# Altium PCB PCB3.PcbDoc (part 1 of 2)
Units mil, origin at the board's own origin, x right, y up, seen from the top; angles counter-clockwise.
Board outline 1930 x 3590 mil, 4 copper layers (Top Layer, Gnd, Voltage, Bottom Layer), stack 26.512 mil thick; 77 components, 87 nets, 563 pads, 158 vias.
Unrouted connection lines stored in the file: 33.
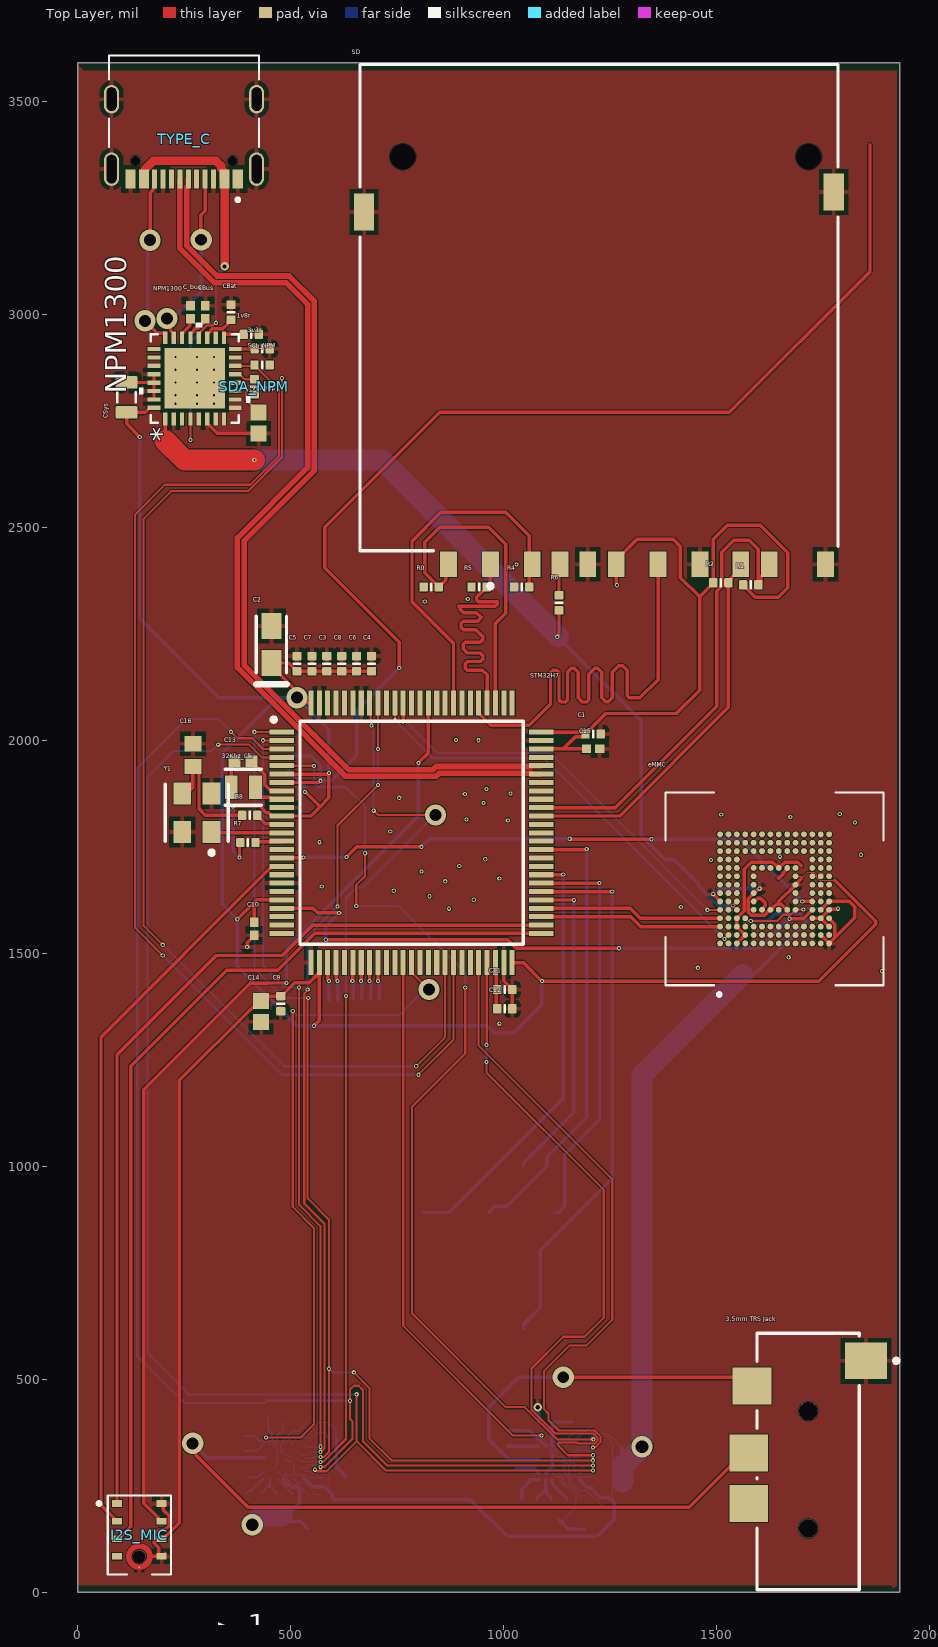
[diagram p0: Top Layer view]
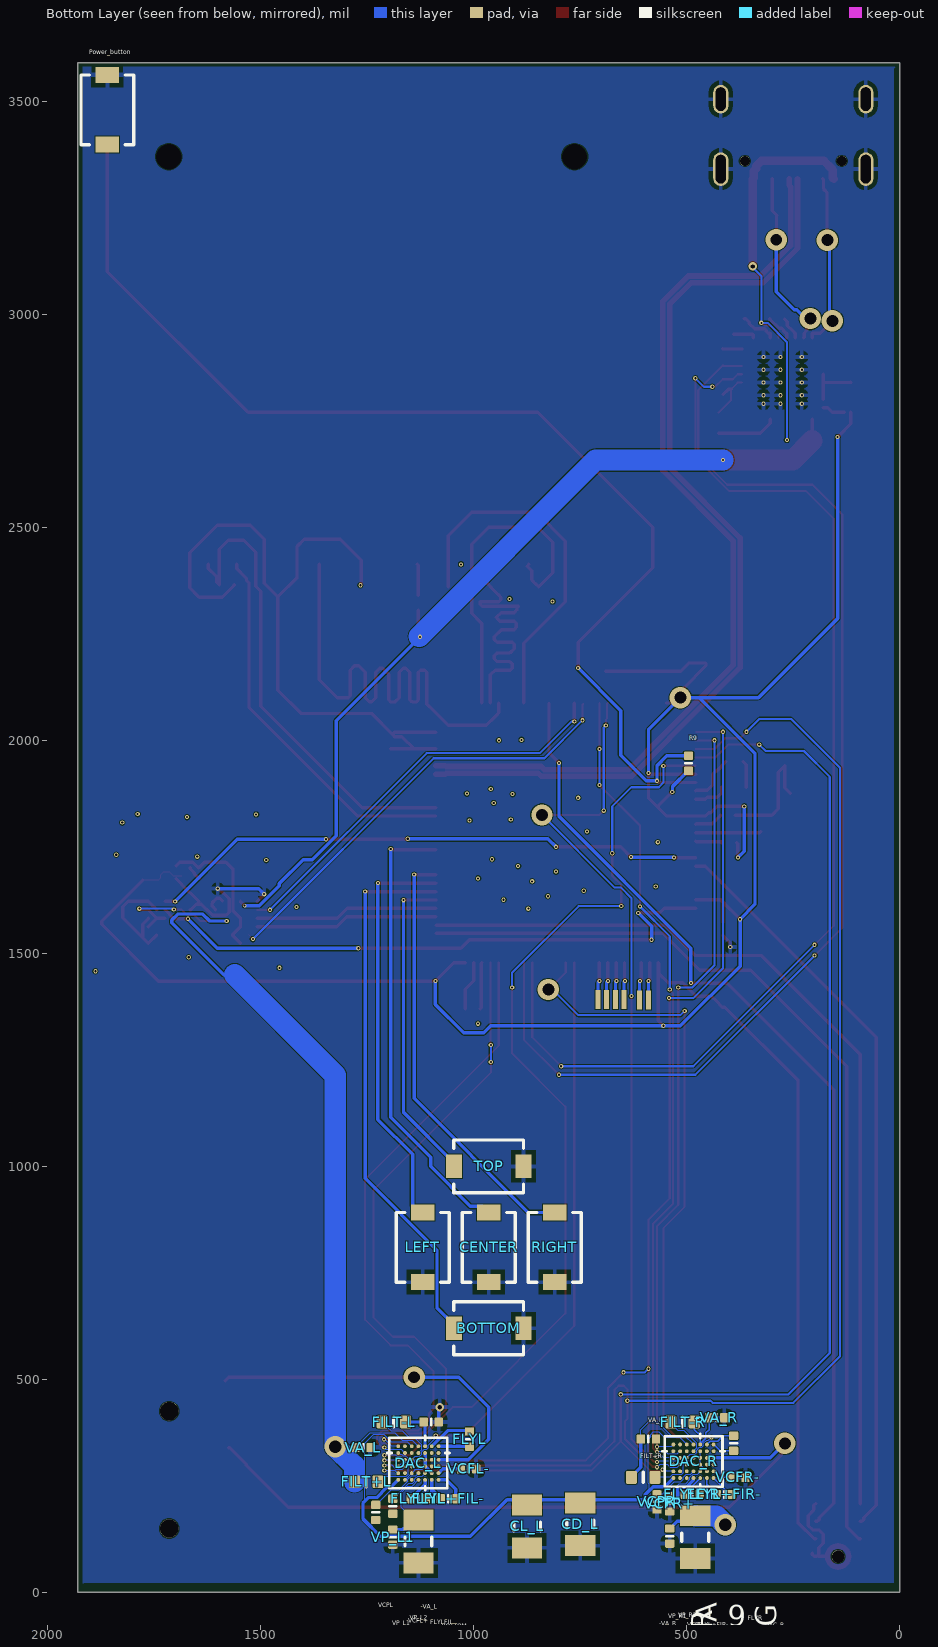
[diagram p1: Bottom Layer view, seen from below]
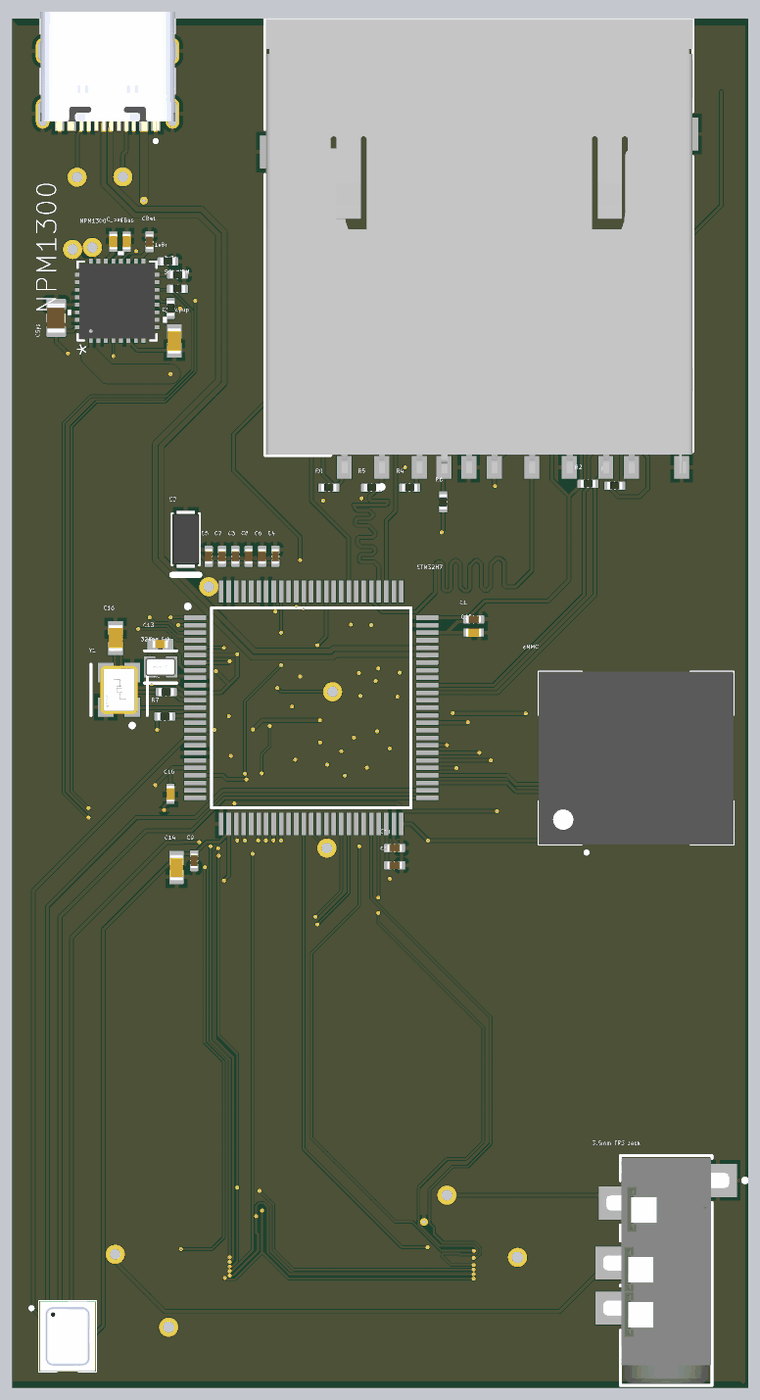
[diagram p3: 3D render of the assembled board from above, using the file's embedded part models]
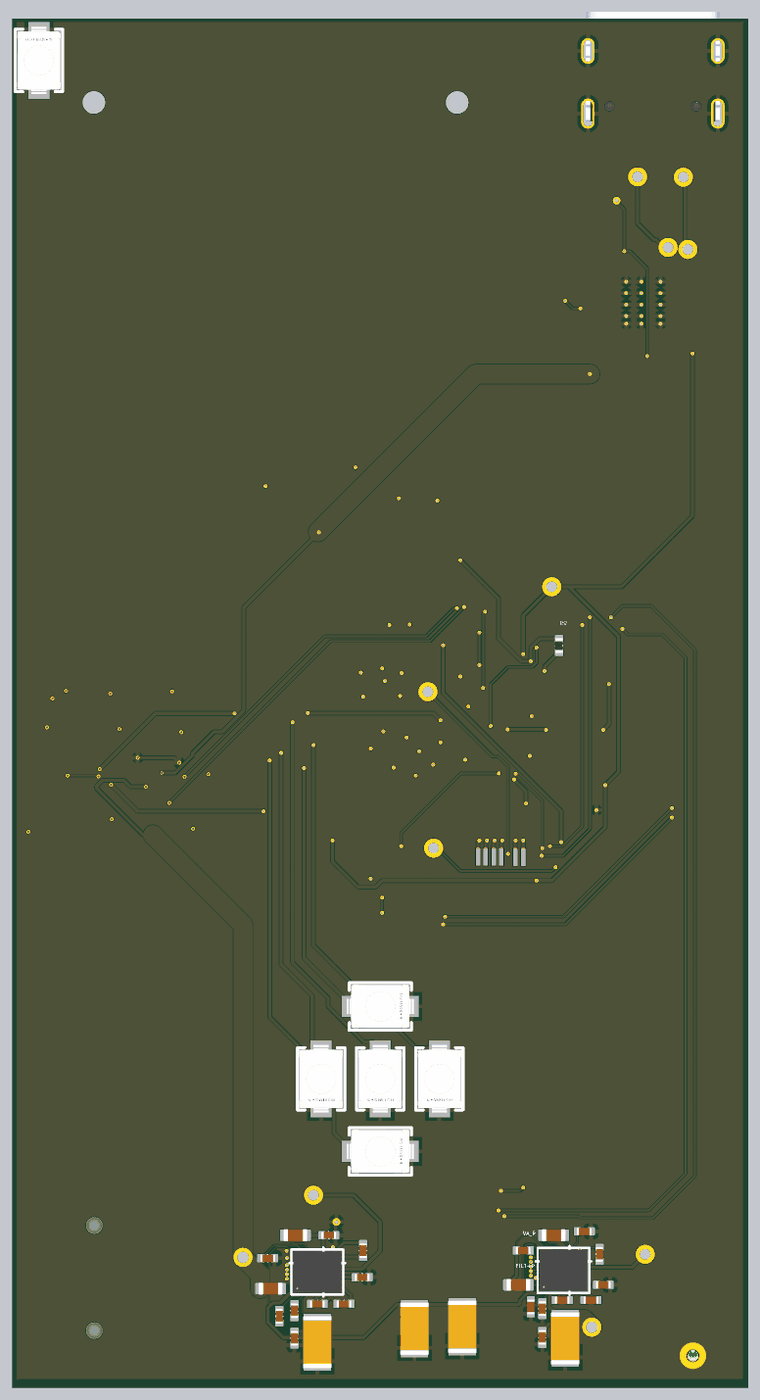
[diagram p4: 3D render of the assembled board from below, using the file's embedded part models]

## Layer stack, top to bottom
Top Solder: solder mask 0.4, Solder Resist, Dk 3.5
Top Layer: signal copper 1.4
Dielectric 2: prepreg 2.8, PP-006, Dk 4.1
Gnd: signal copper 2.7559
Dielectric 1: dielectric 12.6, FR-4, Dk 4.8
Voltage: signal copper 2.7559
Dielectric 3: prepreg 2.8, PP-006, Dk 4.1
Bottom Layer: signal copper 1.4
Bottom Solder: solder mask 0.4, Solder Resist, Dk 3.5

## Board outline
0,0 1930,0 1930,3590 0,3590

## Design rules (kind name [scope] priority, off if disabled: settings)
Clearance Clearance_BGA [InComponent('DAC_L','DAC_R','eMMC')] p1: gap=2 ignorepadtopadclearanceinfootprint=TRUE
Clearance [All] p2: gap=2 ignorepadtopadclearanceinfootprint=FALSE
DiffPairsRouting DiffPair_USB90CDiffPairsRouting [InDifferentialPairClass('USB90C')] p1: maxlimit=3 minlimit=3 mostfreqgap=3 toplayer_minwidth=13 toplayer_maxwidth=13 toplayer_prefwidth=13 midlayer1_minwidth=13 midlayer1_maxwidth=13 midlayer1_prefwidth=13 midlayer2_minwidth=13 midlayer2_maxwidth=13 midlayer2_prefwidth=13 bottomlayer_minwidth=13 bottomlayer_maxwidth=13 bottomlayer_prefwidth=13 maxuncoupledlength=500
DiffPairsRouting DiffPair_USB90CDiffPairsRouting_1 [InDifferentialPairClass('USB90C')] p2: maxlimit=3 minlimit=3 mostfreqgap=3 toplayer_minwidth=13 toplayer_maxwidth=13 toplayer_prefwidth=13 midlayer1_minwidth=13 midlayer1_maxwidth=13 midlayer1_prefwidth=13 midlayer2_minwidth=13 midlayer2_maxwidth=13 midlayer2_prefwidth=13 bottomlayer_minwidth=13 bottomlayer_maxwidth=13 bottomlayer_prefwidth=13 maxuncoupledlength=500
DiffPairsRouting [All] p3: maxlimit=10 minlimit=10 mostfreqgap=10 toplayer_minwidth=15 toplayer_maxwidth=15 toplayer_prefwidth=15 midlayer1_minwidth=15 midlayer1_maxwidth=15 midlayer1_prefwidth=15 midlayer2_minwidth=15 midlayer2_maxwidth=15 midlayer2_prefwidth=15 bottomlayer_minwidth=15 bottomlayer_maxwidth=15 bottomlayer_prefwidth=15 maxuncoupledlength=500
MatchedLengths DiffPair_USB90CMatchedLengths [InDifferentialPairClass('USB90C')] p1: tolerance=1000 checknetsindiffpair=FALSE checkdiffpairvsdiffpair=TRUE checkxsignals=TRUE checkothers=TRUE
MatchedLengths DiffPair_USB90CMatchedLengths_1 [InDifferentialPairClass('USB90C')] p2: tolerance=1000 checknetsindiffpair=FALSE checkdiffpairvsdiffpair=TRUE checkxsignals=TRUE checkothers=TRUE
PolygonConnect [All] p1: connectstyle=Relief reliefconductorwidth=10 reliefentries=4 polygonreliefangle="90 Angle" airgapwidth=10
RoutingVias [All] p1: holewidth=10 width=20 viastyle="Through Hole" minholewidth=2 minwidth=3 maxholewidth=40 maxwidth=50
SilkToSilkClearance [All] p1: silktosilkclearance=0.3
SolderMaskExpansion [All] p1: expansion=0 istentingtop=FALSE
SupplyNets "Schematic Supply Nets_7" [InNet('VCAP')] p1: voltage=0.000
SupplyNets "Schematic Supply Nets_6" [InNet('VAL')] p2: voltage=0.000
SupplyNets "Schematic Supply Nets_3" [InNet('VDDIO')] p3: voltage=0.000
SupplyNets "Schematic Supply Nets_2" [InNet('VBUSIN')] p4: voltage=0.000
SupplyNets "Schematic Supply Nets_1" [InNet('VBAT')] p5: voltage=0.000
SupplyNets "Schematic Supply Nets" [InNet('GND')] p6: voltage=0.000
UnRoutedNet [All] p1: checkbadconnections=TRUE
Width [All] p1: maxlimit=50 minlimit=1 preferedwidth=8
27 further rules are at their usual default settings.

## Classes and differential pairs
differential pair class USB90C: USB_D
component class Designator: C1 eMMC R0 R1 R2 R4 R5 R6 SD
differential pair USB_D: +USB_D_P -USB_D_N

## Components (designator, comment, footprint, x,y, rotation, side; value= is the part's Value field where it differs from the comment)
1v8r "Resistor 47K5 +/-1 % 0402 63 mW" RESC0402(1005)_L 408,2953 r180 top value=47.5k
"3.5mm TRS Jack" "SJ2-3574A-SMT-TR" FP-SJ2-3574A-SMT-TR-MFG 1715,307.48 r90 top
3v3r "301KR2F" RESC0402(1005)_L 433.28,2919 r180 top value=301k
32Khz_Clk "ABS06-32.768KHZ-9-T" FP-ABS06-MFG 389,1890 r180 top
-VA_L "Capacitor 2,2µF +/-20% 10V 0402" CAPC0402(1005)60_L 1100,400 r0 bottom value=2.2µF
-VA_R "Capacitor 2,2µF +/-20% 10V 0402" CAPC0402(1005)60_L 430,410 r0 bottom value=2.2µF
BOTTOM "TL1015AF160QG" FP-TL1015AF160QG-MFG 965,620 r180 bottom
C1 "Capacitor 100nF +/-20% 50V 0402" CAPC0402(1005)60_L 1210,2015 r0 top value=100nF
C2 "TAJA475K016RNJ" AVX-TAJ-A-2_L 455,2225 r90 top value=4.7µF
C3 "Capacitor 100nF +/-20% 50V 0402" CAPC0402(1005)60_L 585,2180 r270 top value=100nF
C4 "Capacitor 100nF +/-20% 50V 0402" CAPC0402(1005)60_L 690,2180 r270 top value=100nF
C5 "Capacitor 100nF +/-20% 50V 0402" CAPC0402(1005)60_L 515,2180 r270 top value=100nF
C6 "Capacitor 100nF +/-20% 50V 0402" CAPC0402(1005)60_L 655,2180 r270 top value=100nF
C7 "Capacitor 100nF +/-20% 50V 0402" CAPC0402(1005)60_L 550,2180 r270 top value=100nF
C8 "Capacitor 100nF +/-20% 50V 0402" CAPC0402(1005)60_L 620,2180 r270 top value=100nF
C9 "Capacitor 100nF +/-20% 50V 0402" CAPC0402(1005)60_L 477,1382 r90 top value=100nF
C10 "Capacitor 1 uF +/- 10% 6.3 V 0402" CAPC1005X55X25LL05T10 415,1558 r90 top value=1µF
C11 "Capacitor 2,2µF +/-20% 10V 0402" CAPC0402(1005)60_L 1002.72,1415 r180 top value=2.2µF
C12 "Capacitor 2,2µF +/-20% 10V 0402" CAPC0402(1005)60_L 1002.72,1370 r180 top value=2.2µF
C13 "Capacitor 10 pF +/- 5% 50 V 0402" CAPC1005X55X25ML05T05 388,1950 r0 top value=10pF
C14 "Capacitor 100 nF +/-10% 50 V 0603" CAPC1608X90X40NL10T20 431,1364 r90 top value=100nF
C15 "Capacitor 1 uF +/- 10% 6.3 V 0402" CAPC1005X55X25LL05T10 1210,1980 r180 top value=1µF
C16 "Capacitor 10 pF +/- 0.25 pF 50 V 0603" CAPC1608X87X35NL15T15 271,1965.43 r270 top value=10pF
C_bus "Capacitor 1 uF +/- 10% 6.3 V 0402" CAPC1005X55X25LL05T10 265,3005 r90 top value=1µF
C_vddpup "Capacitor 100 nF +/-10% 50 V 0603" CAPC1608X90X40NL10T20 425,2745 r90 top value=100nF
CBat "Capacitor 2,2µF +/-20% 10V 0402" CAPC0402(1005)60_L 360,3005 r90 top value=2.2µF
CBus "Capacitor 1 uF +/- 10% 6.3 V 0402" CAPC1005X55X25LL05T10 300,3005 r270 top value=1µF
CD_L "Capacitor 100 uF +/- 20% 6.3 V 1206" CAPC3216X190X55LL30T25 750,160 r90 bottom value=100µF
CENTER "TL1015AF160QG" FP-TL1015AF160QG-MFG 965,810 r270 bottom
CL_L "Capacitor 100 uF +/- 20% 6.3 V 1206" CAPC3216X190X55LL30T25 875,155 r90 bottom value=100µF
CSys "Capacitor 10µF +/-20% 25V 0805" CAPC0805(2012)145_L 115,2805 r270 top value=10µF
DAC_L "CS43131-CWZR" WLCSP42_CS43131-CWZR_CIR 1130,303.62 r90 bottom
DAC_R "CS43131-CWZR" WLCSP42_CS43131-CWZR_CIR 484.25,307.87 r90 bottom
eMMC "EMMC16G-TB29-90F01" BGA153N50P14X14_1300X1150X100N 1636.1,1651.42 r90 top
FILT+L "Capacitor 10µF +/-20% 10V 0603" CAPC0603(1608)100_L 1252.44,260 r0 bottom value=10µF
FILT+R "Capacitor 10µF +/-20% 10V 0603" CAPC0603(1608)100_L 602.44,270 r0 bottom value=10µF
FILT-L "Capacitor 10µF +/-20% 10V 0603" CAPC0603(1608)100_L 1187.56,400 r0 bottom value=10µF
FILT-R "Capacitor 10µF +/-20% 10V 0603" CAPC0603(1608)100_L 510,400 r0 bottom value=10µF
FLYL "Capacitor 2,2µF +/-20% 10V 0402" CAPC0402(1005)60_L 1010,360 r270 bottom value=2.2µF
FLYL+FIL- "Capacitor 2,2µF +/-20% 10V 0402" CAPC0402(1005)60_L 1060,220 r0 bottom value=2.2µF
FLYL+FIR- "Capacitor 2,2µF +/-20% 10V 0402" CAPC0402(1005)60_L 412.28,230 r0 bottom value=2.2µF
FLYLFIL "Capacitor 2,2µF +/-20% 10V 0402" CAPC0402(1005)60_L 1130,220 r0 bottom value=2.2µF
FLYLFIR "Capacitor 2,2µF +/-20% 10V 0402" CAPC0402(1005)60_L 487.72,230 r0 bottom value=2.2µF
FLYR "Capacitor 2,2µF +/-20% 10V 0402" CAPC0402(1005)60_L 390,350 r270 bottom value=2.2µF
I2S_MIC "INMP441ACEZ-R7" MIC_INMP441ACEZ-R7 145,135 r90 top
LEFT "TL1015AF160QG" FP-TL1015AF160QG-MFG 1120,810 r270 bottom
NPM1300 "NPM1300-QEAA-R7" QFN32_5X5_NOR 274.84,2849.5 r90 top
Power_button "TL1015AF160QG" FP-TL1015AF160QG-MFG 1860,3480 r90 bottom
R0 "10KR2F" RESC0402(1005)_L 830,2360 r0 top value=10k
R1 "10KR2F" RESC0402(1005)_L 1580,2365 r0 top value=10k
R2 "10KR2F" RESC0402(1005)_L 1510,2370 r0 top value=10k
R4 "10KR2F" RESC0402(1005)_L 1042.28,2360 r0 top value=10k
R5 "10KR2F" RESC0402(1005)_L 942.28,2360 r0 top value=10k
R6 "10KR2F" RESC0402(1005)_L 1130,2322.72 r270 top value=10k
R7 "10KR2F" RESC0402(1005)_L 400,1760 r180 top value=10k
R8 "33R2J" RESC0402(1005)_L 404,1824 r0 top value=33
R9 "10KR2F" RESC0402(1005)_L 496,1946 r270 bottom value=10k
RIGHT "TL1015AF160QG" FP-TL1015AF160QG-MFG 810,810 r270 bottom
SCL_NPM "10KR2F" RESC0402(1005)_L 433,2881 r180 top value=10k
SD "10067847-001RLF" FCI-10067847-001RLF_V 1223.87,2891.65 r180 top
SDA_NPM "10KR2F" RESC0402(1005)_L 415,2830 r90 top value=10k
STM32H7 "STM32H743VIT6" QFP50P1600X1600X160-100N 784,1783 r0 top
TOP "TL1015AF160QG" FP-TL1015AF160QG-MFG 965,1000 r180 bottom
TYPE_C "TYPE-C-31-M-12" HRO_TYPE-C-31-M-12 250,3505 r180 top
VA_L "Capacitor 2,2µF +/-20% 10V 0402" CAPC0402(1005)60_L 1260,340 r0 bottom value=2.2µF
VA_R "Capacitor 2,2µF +/-20% 10V 0402" CAPC0402(1005)60_L 590,360 r0 bottom value=2.2µF
VCFL+ "Capacitor 2,2µF +/-20% 10V 0402" CAPC0402(1005)60_L 1190,202.28 r90 bottom value=2.2µF
VCFL- "Capacitor 2,2µF +/-20% 10V 0402" CAPC0402(1005)60_L 1012.28,290 r0 bottom value=2.2µF
VCFR+ "Capacitor 2,2µF +/-20% 10V 0402" CAPC0402(1005)60_L 540,207.72 r90 bottom value=2.2µF
VCFR- "Capacitor 2,2µF +/-20% 10V 0402" CAPC0402(1005)60_L 380,270 r0 bottom value=2.2µF
VCPL "Capacitor 2,2µF +/-20% 10V 0402" CAPC0402(1005)60_L 1230,187.72 r90 bottom value=2.2µF
VCPR "Capacitor 2,2µF +/-20% 10V 0402" CAPC0402(1005)60_L 570,212.28 r90 bottom value=2.2µF
VP_L1 "Capacitor 470nF +/-40% 10V 0402" CAPC0402(1005)60_L 1190,130 r90 bottom value=470nF
VP_L2 "Capacitor 100 uF +/- 20% 6.3 V 1206" CAPC3216X190X55LL30T25 1130,119.8 r90 bottom value=100µF
VP_R1 "Capacitor 470nF +/-40% 10V 0402" CAPC0402(1005)60_L 540,132.28 r90 bottom value=470nF
VP_R2 "Capacitor 100 uF +/- 20% 6.3 V 1206" CAPC3216X190X55LL30T25 480,129.8 r90 bottom value=100µF
Y1 "ABM8-25.000MHZ-10-B1U-T" FP-ABM8-MFG 280,1830 r90 top

## Footprints (in the part's own frame and the unit in brackets; to place one, negate y for a bottom-side part, rotate by r counter-clockwise, add the part's x,y. Pads: shape width x height; smd on the part's side, far side on the other; paste and mask are expansions set on the pad)
AVX-TAJ-A-2_L [mm] "Molded Capacitor, 2-Leads, Body 3.4x1.8mm, IPC High Density"
  rect 1.55x1.2 smd: 1(-1.1,0) 2(1.1,0)
  silkscreen extent -2.37,-0.9 1.7,0.9, body extent -1.92,-0.9 1.92,0.9, height 1.8
BGA153N50P14X14_1300X1150X100N [mm]
  round 0.35 smd paste+0 mask+0.025: A1(-3.25,3.25) A2(-2.75,3.25) A3(-2.25,3.25) A4(-1.75,3.25) A5(-1.25,3.25) A6(-0.75,3.25) A7(-0.25,3.25) A8(0.25,3.25) A9(0.75,3.25) A10(1.25,3.25) A11(1.75,3.25) A12(2.25,3.25) A13(2.75,3.25) A14(3.25,3.25) B1(-3.25,2.75) B2(-2.75,2.75) B3(-2.25,2.75) B4(-1.75,2.75) B5(-1.25,2.75) B6(-0.75,2.75) B7(-0.25,2.75) B8(0.25,2.75) B9(0.75,2.75) B10(1.25,2.75) B11(1.75,2.75) B12(2.25,2.75) B13(2.75,2.75) B14(3.25,2.75) C1(-3.25,2.25) C2(-2.75,2.25) C3(-2.25,2.25) C4(-1.75,2.25) C5(-1.25,2.25) C6(-0.75,2.25) C7(-0.25,2.25) C8(0.25,2.25) C9(0.75,2.25) C10(1.25,2.25) C11(1.75,2.25) C12(2.25,2.25) C13(2.75,2.25) C14(3.25,2.25) D1(-3.25,1.75) D2(-2.75,1.75) D3(-2.25,1.75) D4(-1.75,1.75) D12(2.25,1.75) D13(2.75,1.75) D14(3.25,1.75) E1(-3.25,1.25) E2(-2.75,1.25) E3(-2.25,1.25) E5(-1.25,1.25) E6(-0.75,1.25) E7(-0.25,1.25) E8(0.25,1.25) E9(0.75,1.25) E10(1.25,1.25) E12(2.25,1.25) E13(2.75,1.25) E14(3.25,1.25) F1(-3.25,0.75) F2(-2.75,0.75) F3(-2.25,0.75) F5(-1.25,0.75) F10(1.25,0.75) F12(2.25,0.75) F13(2.75,0.75) F14(3.25,0.75) G1(-3.25,0.25) G2(-2.75,0.25) G3(-2.25,0.25) G5(-1.25,0.25) G10(1.25,0.25) G12(2.25,0.25) G13(2.75,0.25) G14(3.25,0.25) H1(-3.25,-0.25) H2(-2.75,-0.25) H3(-2.25,-0.25) H5(-1.25,-0.25) H10(1.25,-0.25) H12(2.25,-0.25) H13(2.75,-0.25) H14(3.25,-0.25) J1(-3.25,-0.75) J2(-2.75,-0.75) J3(-2.25,-0.75) J5(-1.25,-0.75) J10(1.25,-0.75) J12(2.25,-0.75) J13(2.75,-0.75) J14(3.25,-0.75) K1(-3.25,-1.25) K2(-2.75,-1.25) K3(-2.25,-1.25) K5(-1.25,-1.25) K6(-0.75,-1.25) K7(-0.25,-1.25) K8(0.25,-1.25) K9(0.75,-1.25) K10(1.25,-1.25) K12(2.25,-1.25) K13(2.75,-1.25) K14(3.25,-1.25) L1(-3.25,-1.75) L2(-2.75,-1.75) L3(-2.25,-1.75) L12(2.25,-1.75) L13(2.75,-1.75) L14(3.25,-1.75) M1(-3.25,-2.25) M2(-2.75,-2.25) M3(-2.25,-2.25) M4(-1.75,-2.25) M5(-1.25,-2.25) M6(-0.75,-2.25) M7(-0.25,-2.25) M8(0.25,-2.25) M9(0.75,-2.25) M10(1.25,-2.25) M11(1.75,-2.25) M12(2.25,-2.25) M13(2.75,-2.25) M14(3.25,-2.25) N1(-3.25,-2.75) N2(-2.75,-2.75) N3(-2.25,-2.75) N4(-1.75,-2.75) N5(-1.25,-2.75) N6(-0.75,-2.75) N7(-0.25,-2.75) N8(0.25,-2.75) N9(0.75,-2.75) N10(1.25,-2.75) N11(1.75,-2.75) N12(2.25,-2.75) N13(2.75,-2.75) N14(3.25,-2.75) P1(-3.25,-3.25) P2(-2.75,-3.25) P3(-2.25,-3.25) P4(-1.75,-3.25) P5(-1.25,-3.25) P6(-0.75,-3.25) P7(-0.25,-3.25) P8(0.25,-3.25) P9(0.75,-3.25) P10(1.25,-3.25) P11(1.75,-3.25) P12(2.25,-3.25) P13(2.75,-3.25) P14(3.25,-3.25)
  silkscreen extent -6.4,-6.5 5.75,6.5, body extent -5.75,-6.5 5.75,6.5, height 1
CAPC0402(1005)60_L [mm] "Chip Capacitor, Body 1.0x0.5mm, Height 0.6mm, IPC High Density"
  rrect25% 0.5x0.55 smd: 1(-0.45,0) 2(0.45,0)
  silkscreen extent 0,-0.2 0,0.2, body extent -0.5,-0.25 0.5,0.25, height 0.6
CAPC0603(1608)100_L [mm] "Chip Capacitor, Body 1.6x0.8mm, Height 1.0mm, IPC High Density"
  rrect25% 0.66x0.76 smd: 1(-0.7,0) 2(0.7,0)
  silkscreen extent 0,-0.3 0,0.3, body extent -0.8,-0.4 0.8,0.4, height 0.95
CAPC0805(2012)145_L [mm] "Chip Capacitor, Body 2.0x1.2mm, Height 1.45mm, IPC High Density"
  rrect25% 0.76x1.3 smd: 1(-0.9,0) 2(0.89,0)
  silkscreen extent -0.3,-0.55 0.3,0.55, body extent -1,-0.6 1,0.6, height 1.45
CAPC1005X55X25LL05T10 [mm] "Chip Capacitor, 2-Leads, Body 1.05x0.55mm, IPC High Density"
  rect 0.56x0.52 smd: 1(-0.39,0) 2(0.39,0)
  body extent -0.53,-0.28 0.53,0.28, height 0.55
CAPC1005X55X25ML05T05 [mm] "Chip Capacitor, 2-Leads, Body 1.05x0.55mm, IPC Low Density"
  rect 0.72x0.72 smd: 1(-0.51,0) 2(0.51,0)
  body extent -0.53,-0.28 0.53,0.28, height 0.55
CAPC1608X87X35NL15T15 [mm] "Chip Capacitor, 2-Leads, Body 1.75x0.95mm, IPC Medium Density"
  rect 0.9x1 smd: 1(-0.675,0) 2(0.675,0)
  body extent -0.87,-0.48 0.87,0.48, height 0.87
CAPC1608X90X40NL10T20 [mm] "Chip Capacitor, 2-Leads, Body 1.70x0.90mm, IPC Medium Density"
  rect 0.95x0.95 smd: 1(-0.625,0) 2(0.625,0)
  body extent -0.85,-0.45 0.85,0.45, height 0.9
CAPC3216X190X55LL30T25 [mm] "Chip Capacitor, 2-Leads, Body 3.5x1.9mm, IPC High Density"
  rect 1.25x1.8 smd: 1(-1.275,0) 2(1.275,0)
  silkscreen extent -0.25,-0.8 0.25,0.8, body extent -1.75,-0.95 1.75,0.95, height 1.9
FCI-10067847-001RLF_V [mm] "CONN, 11-Leads, Body 29x28.5mm"
  rect 1x1.5 smd: 1(6.475,12.15) 2(3.975,12.15) 3(0.675,12.15) 4(-1.025,12.15) 5(-3.525,12.15) 6(-6.025,12.15) 7(-8.45,12.15) 8(-10.15,12.15) 9(8.975,12.15) 10(2.325,12.15) 11(-13.5,12.15)
  rect 1.2x2.2 smd: 12(-14,-10.05) 13(14,-8.85)
  round 0 hole 1.5 unplated: MH1(-12.5,-12.15) MH2(11.7,-12.15)
  silkscreen extent -14.25,-17.65 14.25,13.57, body extent -14.24,-17.7 14.21,12.56, height 2.9
FP-ABM8-MFG [mm]
  rect 1.3x1.05 smd paste+0 mask+0: 1(-1.15,-0.875) 2(1.15,-0.875) 3(1.15,0.875) 4(-1.15,0.875)
  silkscreen extent -2.5,-1.88 1.7,1.88, body extent -1.9,-1.5 1.9,1.5, height 0.25
FP-ABS06-MFG [mm]
  rect 0.75x1.4 smd paste+0 mask+0: 1(-0.725,0) 2(0.725,0)
  silkscreen extent -1.07,-1.07 1.07,1.07, body extent -1.2,-0.8 1.2,0.8, height 0.25
FP-SJ2-3574A-SMT-TR-MFG [mm]
  rect 2.2x2.5 smd paste+0 mask+0: 1(6,-3.45)
  rect 2.2x2.3 smd paste+0 mask+0: 2(4.5,3.35) 3(0.5,3.55) 4(-2.5,3.55)
  round 1.1 hole 1.1 unplated paste-2539.97 mask+0: ""(-4,0) ""(3,0)
  silkscreen extent -7.65,-5.38 7.65,3.05, body extent -7.75,-4.8 7.75,4.8, height 0.25
FP-TL1015AF160QG-MFG [mm]
  rect 0.95x1.4 smd paste+0 mask+0: 1(-2.075,0) 2(2.075,0)
  silkscreen extent -2.07,-1.58 2.07,1.58, body extent -2.25,-1.45 2.25,1.45, height 2.1
HRO_TYPE-C-31-M-12 [mm]
  rect 0.6x1.14 smd mask+0.05: A1_B12(-3.2,4.75) A4_B9(-2.4,4.75) B1_A12(3.2,4.75) B4_A9(2.4,4.75)
  rect 0.3x1.14 smd mask+0.05: A5(-1.25,4.75) A6(-0.25,4.75) A7(0.25,4.75) A8(1.25,4.75) B5(1.75,4.75) B6(0.75,4.75) B7(-0.75,4.75) B8(-1.75,4.75)
  oval 0.9x2 hole 0.6 slot 1.7 at 90 deg: S1(-4.325,4.17) S2(4.325,4.17)
  oval 0.9x1.7 hole 0.6 slot 1.4 at 90 deg: S3(-4.325,0) S4(4.325,0)
  round 0.6 hole 0.6 unplated: ""(-2.89,3.68) ""(2.89,3.68)
  silkscreen extent -4.47,-2.6 4.47,6.1, body extent -4.47,-2.6 4.47,5.31, height 3.31
MIC_INMP441ACEZ-R7 [mm]
  rect 0.4x0.6 smd paste-0.025: 1(1.87,1.33) 2(0.82,1.33) 3(-0.23,1.33) 4(-1.28,1.33) 6(-1.28,-1.33) 7(-0.23,-1.33) 8(0.82,-1.33) 9(1.87,-1.33)
  rect 0.1x0.1 smd paste-1 mask+0: 5(-1.92,0)
  round 0.75 hole 0.75 unplated mask+0.505: ""(-1.29,0)
  Top Layer region: 243 vertices and 0 holes, not listed, extent -2.07,-0.78 -0.51,0.78
  silkscreen extent -2.36,-1.88 2.36,2.5, body extent -2.36,-1.88 2.36,1.88, height 1.05
QFN32_5X5_NOR [mil]
  rect 30x10 smd paste+0 mask+0: 1(-95.5,68.9) 2(-95.5,49.21) 3(-95.5,29.53) 4(-95.5,9.84) 5(-95.5,-9.84) 6(-95.5,-29.53) 7(-95.5,-49.21) 8(-95.5,-68.9) 17(95.5,-68.9) 18(95.5,-49.21) 19(95.5,-29.53) 20(95.5,-9.84) 21(95.5,9.84) 22(95.5,29.53) 23(95.5,49.21) 24(95.5,68.9)
  rect 10x30 smd paste+0 mask+0: 9(-68.9,-95.5) 10(-49.21,-95.5) 11(-29.53,-95.5) 12(-9.84,-95.5) 13(9.84,-95.5) 14(29.53,-95.5) 15(49.21,-95.5) 16(68.9,-95.5) 25(68.9,95.5) 26(49.21,95.5) 27(29.53,95.5) 28(9.84,95.5) 29(-9.84,95.5) 30(-29.53,95.5) 31(-49.21,95.5) 32(-68.9,95.5)
  rect 142x142 smd paste-71 mask+0: 33(0,0)
  silkscreen extent -104,-130 130,130, body extent -99,-99 99,99, height 35
QFP50P1600X1600X160-100N [mm]
  rect 1.475x0.3 smd: 1(-7.738,6) 2(-7.738,5.5) 3(-7.738,5) 4(-7.738,4.5) 5(-7.738,4) 6(-7.738,3.5) 7(-7.738,3) 8(-7.738,2.5) 9(-7.738,2) 10(-7.738,1.5) 11(-7.738,1) 12(-7.738,0.5) 13(-7.738,0) 14(-7.738,-0.5) 15(-7.738,-1) 16(-7.738,-1.5) 17(-7.738,-2) 18(-7.738,-2.5) 19(-7.738,-3) 20(-7.738,-3.5) 21(-7.738,-4) 22(-7.738,-4.5) 23(-7.738,-5) 24(-7.738,-5.5) 25(-7.738,-6) 51(7.738,-6) 52(7.738,-5.5) 53(7.738,-5) 54(7.738,-4.5) 55(7.738,-4) 56(7.738,-3.5) 57(7.738,-3) 58(7.738,-2.5) 59(7.738,-2) 60(7.738,-1.5) 61(7.738,-1) 62(7.738,-0.5) 63(7.738,0) 64(7.738,0.5) 65(7.738,1) 66(7.738,1.5) 67(7.738,2) 68(7.738,2.5) 69(7.738,3) 70(7.738,3.5) 71(7.738,4) 72(7.738,4.5) 73(7.738,5) 74(7.738,5.5) 75(7.738,6)
  rect 0.3x1.475 smd: 26(-6,-7.738) 27(-5.5,-7.738) 28(-5,-7.738) 29(-4.5,-7.738) 30(-4,-7.738) 31(-3.5,-7.738) 32(-3,-7.738) 33(-2.5,-7.738) 34(-2,-7.738) 35(-1.5,-7.738) 36(-1,-7.738) 37(-0.5,-7.738) 38(0,-7.738) 39(0.5,-7.738) 40(1,-7.738) 41(1.5,-7.738) 42(2,-7.738) 43(2.5,-7.738) 44(3,-7.738) 45(3.5,-7.738) 46(4,-7.738) 47(4.5,-7.738) 48(5,-7.738) 49(5.5,-7.738) 50(6,-7.738) 76(6,7.738) 77(5.5,7.738) 78(5,7.738) 79(4.5,7.738) 80(4,7.738) 81(3.5,7.738) 82(3,7.738) 83(2.5,7.738) 84(2,7.738) 85(1.5,7.738) 86(1,7.738) 87(0.5,7.738) 88(0,7.738) 89(-0.5,7.738) 90(-1,7.738) 91(-1.5,7.738) 92(-2,7.738) 93(-2.5,7.738) 94(-3,7.738) 95(-3.5,7.738) 96(-4,7.738) 97(-4.5,7.738) 98(-5,7.738) 99(-5.5,7.738) 100(-6,7.738)
  silkscreen extent -8.35,-6.65 6.65,6.87
RESC0402(1005)_L [mm] "Chip Resistor, Body 1.0x0.5mm, IPC High Density"
  rrect25% 0.5x0.55 smd: 1(-0.45,0) 2(0.45,0)
  silkscreen extent 0,-0.2 0,0.2, body extent -0.5,-0.25 0.5,0.25, height 0.3
WLCSP42_CS43131-CWZR_CIR [mil]
  round 9 smd paste+0 mask+0: A1(-39.37,47.24) A2(-23.62,47.24) A3(-7.87,47.24) A4(7.87,47.24) A5(23.62,47.24) A6(39.37,47.24) B1(-39.37,31.5) B2(-23.62,31.5) B3(-7.87,31.5) B4(7.87,31.5) B5(23.62,31.5) B6(39.37,31.5) C1(-39.37,15.75) C2(-23.62,15.75) C3(-7.87,15.75) C4(7.87,15.75) C5(23.62,15.75) C6(39.37,15.75) D1(-39.37,0) D2(-23.62,0) D3(-7.87,0) D4(7.87,0) D5(23.62,0) D6(39.37,0) E1(-39.37,-15.75) E2(-23.62,-15.75) E3(-7.87,-15.75) E4(7.87,-15.75) E5(23.62,-15.75) E6(39.37,-15.75) F1(-39.37,-31.5) F2(-23.62,-31.5) F3(-7.87,-31.5) F4(7.87,-31.5) F5(23.62,-31.5) F6(39.37,-31.5) G1(-39.37,-47.24) G2(-23.62,-47.24) G3(-7.87,-47.24) G4(7.87,-47.24) G5(23.62,-47.24) G6(39.37,-47.24)
  silkscreen extent -64,-73 64,73, body extent -54,-63 54,63, height 21

## Part data
1v8r: library part CMP-009-00137-3, "Chip Resistor, 47,5 kOhms, +/-1 %, 63 mW, -55 to 155 degC, 0402", Case/Package=0402, Max Operating Temperature=155°C, Min Operating Temperature=-55°C, Power=63mW, Tolerance=1%, Pins=2
"3.5mm TRS Jack": library part CMP-14818-000001-1, "AUDIO JACK, 3.5 MM, RT, 4 CONDUC", Current Rating=1A, Manufacturer=CUI, Temperature="-25°C to +85°C", Temperature Range High=+85°C, Temperature Range Low=-25°C, Voltage Rating=12V, Automotive=No, Category=Conn, ComponentLink2Description=Datasheet, ComponentLink2URL=https://www.cui.com/product/resource/sj2-357x-smt.pdf, Conn Orientation=Horizontal, Contact Material=Silver, Device Class L1=Connectors, Device Class L2="Audio / Video Connectors", Device Class L3=unset, Digikey Description="AUDIO JACK, 3.5 MM, RT, 4 CONDUC", Height=5.3mm, Lead Free=Yes, Manufacturer Part Number=SJ2-3574A-SMT-TR, Number Of Contacts=4, Octopart=https://octopart.com/sj2-3574a-smt-tr-cui-77838840, Package=SJ2-3574A-SMT-TR, RoHS=TRUE
3v3r: library part CMP-009-00092-2, "301K 0.063W 1% 0402 (1005 Metric)  SMD", Case/Package=0402, Power=63mW, Tolerance=1%, Mounting Technology=SMT, Pins=2
32Khz_Clk: library part CMP-27762-015421-1, "Crystal 32.768kHz ±20ppm (Tol) 9pF FUND 90kΩ 2-Pin Mini-CSMD T/R", Case/Package=CSMD, ESR (Equivalent Series Resistance)=90kR, Frequency=32.768kHz, Frequency Tolerance=20ppm, Load Capacitance=9pF, Max Operating Temperature=85°C, Min Operating Temperature=-40°C, Package Quantity=3000, Depth=1.2mm, Height=0.6mm, Lead Free="Lead Free", Length=2mm, Mount="Surface Mount", Number of Pins=2, Packaging="Tape and Reel", RoHS Compliant=Yes, Series=ABS06, Termination=SMD/SMT, Tolerance=20ppm, Width=1.2mm
-VA_L -VA_R C11 C12 CBat FLYL FLYL+FIL- FLYL+FIR- FLYLFIL FLYLFIR FLYR VA_L VA_R VCFL+ VCFL- VCFR+ VCFR- VCPL VCPR: library part CMP-001-00056-4, "Chip Capacitor, 2,2µF +/-20%, 10V, 0402, Thickness 0.6 mm", Case/Package=0402, Max Operating Temperature=85°C, Min Operating Temperature=-55°C, Tolerance=10%, Voltage Rating=10V, Mounting Technology=SMT, Pins=2
BOTTOM CENTER LEFT Power_button RIGHT TOP: library part CMP-17879-000003-1, "SWITCH TACTILE SPST-NO 0.05A 12V", Case/Package=SMD/SMT, Color=Beige, Contact Current Rating=50mA, Contact Resistance=100mR, Max Operating Temperature=70°C, Max Voltage Rating (DC)=12V, Min Operating Temperature=-20°C, Operating Force=160gf, Package Quantity=1, Actuator Length=0.5mm, Actuator Material=Nylon, Actuator Type=Standard, Contact Material=Silver, Contact Plating=Silver, Current Rating=50mA, Electrical Life=50000Cycles, Illumination Type=Non-Illuminated, Lead Free="Lead Free", Mechanical Life=200000Cycles, Mount="Surface Mount", Orientation=Straight, Packaging="Tape and Reel", REACH SVHC="No SVHC", Switch Function=Off-Mom, Switch Travel=0.2mm, Termination="Gull Wing", Throw Configuration=SPST, Voltage Rating (DC)=12V
C1 C3 C4 C5 C6 C7 C8 C9: library part CMP-001-00067-3, "Chip Capacitor, 100nF +/-20%, 50V, 0402, Thickness 0.6 mm", Case/Package=0402, Max Operating Temperature=85°C, Min Operating Temperature=-55°C, Tolerance=10%, Voltage Rating=50V, Mounting Technology=SMT, Pins=2
C2: library part CMP-001-00042-7, "Standard Tantalum, 4.7 uF, +/- 10%, 16 V, -55 to 125 degC, 1206 (3216 Metric), RoHS, Tape and Reel", Capacitor Type=Tantalum, Case/Package=1206, Manufacturer=AVX, Max Operating Temperature=125°C, Min Operating Temperature=-55°C, Package Description="2-Pin Surface Mount Device, Body 3.2 x 1.65 mm", Package Quantity=2000, Package Reference=TAJ-A-2, Resistance=4Ohm, Tolerance=10%, Voltage Rating=16V, Datasheet URL=http://datasheets.avx.com/TAJ.pdf, Datasheet Version=Feb-16, ESR=4Ohm, Manufacturer URL=http://www.avx.com/, Mounting Technology=SM, Packaging=TapeandReel, Pins=2, RoHS Compliant=True
C10 C15 C_bus CBus: library part CMP-001-00008-6, "Chip Capacitor, 1 uF, +/- 10%, 6.3 V, 0402 (1005 Metric)", Capacitor Type=Ceramic, Case/Package=0402, Max Operating Temperature=85°C, Min Operating Temperature=-55°C, Tolerance=10%, Voltage Rating=6.3V, Mounting Technology=SM, Pins=2, RoHS Compliant=True
C13: library part CMP-001-00013-6, "Chip Capacitor, 10 pF, +/- 5%, 50 V, 0402 (1005 Metric)", Capacitor Type=Ceramic, Case/Package=0402, Max Operating Temperature=125°C, Min Operating Temperature=-55°C, Tolerance=5%, Voltage Rating=50V, Mounting Technology=SM, Pins=2, RoHS Compliant=True
C14 C_vddpup: library part CMP-001-00017-6, "Chip Capacitor, 100 nF, +/- 10%, 50 V, 0603 (1608 Metric)", Capacitor Type=Ceramic, Case/Package=0603, Max Operating Temperature=125°C, Min Operating Temperature=-55°C, Tolerance=10%, Voltage Rating=50V, Mounting Technology=SM, Pins=2, RoHS Compliant=True
C16: library part CMP-001-00012-6, "Chip Capacitor, 10 pF, +/- 0.25 pF, 50 V, 0603 (1608 Metric)", Capacitor Type=Ceramic, Case/Package=0603, Max Operating Temperature=125°C, Min Operating Temperature=-55°C, Tolerance=0.25%, Voltage Rating=50V, Mounting Technology=SM, Pins=2, RoHS Compliant=True
CD_L CL_L VP_L2 VP_R2: library part CMP-001-00019-6, "Chip Capacitor, 100 uF, +/- 20%, 6.3 V, 1206 (3216 Metric)", Capacitor Type=Ceramic, Case/Package=1206, Max Operating Temperature=85°C, Min Operating Temperature=-55°C, Tolerance=20%, Voltage Rating=6.3V, Mounting Technology=SM, Pins=2, RoHS Compliant=True
CSys: library part CMP-001-00079-4, "Chip Capacitor, 10µF +/-20%, 25V, 0805, Thickness 1.45 mm", Case/Package=0805, Max Operating Temperature=85°C, Min Operating Temperature=-55°C, Tolerance=10%, Voltage Rating=25V, Mounting Technology=SMT, Pins=2
DAC_L DAC_R: library part CMP-057-000000-1, "Description", Manufacturer_Name="Cirrus Logic", Copyright="Copyright (C) 2025 Ultra Librarian. All rights reserved.", Design Item ID=CS43131-CWZR, Manufacturer_Part_Number=CS43131-CWZR, RefDes=RefDes, Source=CS43131-CWZR.SchLib, Type=Type
eMMC: library part CMP-054-000000-1, "eMMC 5.1 (HS400) 153B 16GB", Package=None, Check_prices=https://www.snapeda.com/parts/EMMC16G-TB29-90F01/Kingston/view-part/?ref=eda, Component Type=Standard, Design Item ID=EMMC16G-TB29-90F01, MF=Kingston, MP=EMMC16G-TB29-90F01, Pin Count=153, SnapEDA_Link=https://www.snapeda.com/parts/EMMC16G-TB29-90F01/Kingston/view-part/?ref=snap, Source=EMMC16G-TB29-90F01.SchLib
FILT+L FILT+R FILT-L FILT-R: library part CMP-001-00075-4, "Chip Capacitor, 10µF +/-20%, 10V, 0603, Thickness 1 mm", Case/Package=0603, Max Operating Temperature=85°C, Min Operating Temperature=-55°C, Tolerance=10%, Voltage Rating=10V, Mounting Technology=SMT, Pins=2
I2S_MIC: library part CMP-062-000000-1, "60 Hz ~ 15 kHz Digital, I2S Microphone MEMS (Silicon) 1.62 V ~ 3.63 V Omnidirectional (-26dB Â±3dB @ 94dB SPL) Solder Pads", Package="LGA-9 TDK InvenSense", Check_prices=https://www.snapeda.com/parts/INMP441ACEZ-R7/TDK/view-part/?ref=eda, Component Type=Standard, Design Item ID=INMP441ACEZ-R7, MF="TDK InvenSense", MP=INMP441ACEZ-R7, Pin Count=9, SnapEDA_Link=https://www.snapeda.com/parts/INMP441ACEZ-R7/TDK/view-part/?ref=snap, Source=INMP441ACEZ-R7.SchLib
NPM1300: library part CMP-052-000000-1, "Description", Manufacturer_Name="Nordic Semiconductor", Copyright="Copyright (C) 2026 Ultra Librarian. All rights reserved.", Design Item ID=NPM1300-QEAA-R7, Manufacturer_Part_Number=NPM1300-QEAA-R7, RefDes=RefDes, Source=NPM1300-QEAA-R7.SchLib, Type=Type
R0 R1 R2 R4 R5 R6 R7 R9 SCL_NPM SDA_NPM: library part CMP-009-00066-2, "10K 0.063W 1% 0402 (1005 Metric)  SMD", Case/Package=0402, Power=63mW, Tolerance=1%, Mounting Technology=SMT, Pins=2
R8: library part CMP-009-00096-2, "33R 0.063W 5% 0402 (1005 Metric)  SMD", Case/Package=0402, Power=63mW, Tolerance=5%, Mounting Technology=SMT, Pins=2
SD: library part CMP-2000-05818-1, "Assembly SD Card Reader, Famale, 11 Way, -40 to 105 degC, RoHS, Tape and Reel", Manufacturer="FCI Electronics", Package Description="11-Pin Surface Mount Device, Body 29 x 28.5 mm", Connector Type=MemoryCard, Contact Material=CopperAlloy, Contact Plating=GoldPlatedContacts, Datasheet URL=https://datasheet.ciiva.com/1106/10067847-1106690.pdf, Datasheet Version="Rev. K, 09/2014", Manufacturer URL=http://portal.fciconnect.com/, Mounting Technology=SurfaceMount, No. of Contacts=11Contacts, Package Reference=10067847-001RLF, Product Range=-, SVHC=NoSVHC(15-Jun-2015)
STM32H7: library part CMP-060-000000-1, "ARM Microcontrollers - MCU High-performance and DSP with DP-FPU, ARM Cortex-M7 MCU with 2MBytes Flash, 1MB RAM, 400 MHz CPU, Art Accelerator, L1 cache, external memory interface, large set of peripherals", Manufacturer_Name=STMicroelectronics, Datasheet Link=https://www.st.com/resource/en/datasheet/stm32h743vi.pdf, Design Item ID=STM32H743VIT6, Geometry.Height=1.6mm, Manufacturer_Part_Number=STM32H743VIT6, Source=STM32H743VIT6.SchLib
TYPE_C: library part CMP-027-000000-1, "USB Connectors 24 Receptacle 1 8.94*7.3mm RoHS", Package=Package, Check_prices=https://www.snapeda.com/parts/TYPE-C-31-M-12/HRO+Electronics+Co.%252C+Ltd./view-part/?ref=eda, Component Type=Standard, Design Item ID=TYPE-C-31-M-12, MF="HRO Electronics Co., Ltd.", MP=TYPE-C-31-M-12, Pin Count=16, SnapEDA_Link=https://www.snapeda.com/parts/TYPE-C-31-M-12/HRO+Electronics+Co.%252C+Ltd./view-part/?ref=snap, Source=TYPE-C-31-M-12.SchLib
VP_L1 VP_R1: library part CMP-001-00060-4, "Chip Capacitor, 470nF +/-40%, 10V, 0402, Thickness 0.6 mm", Case/Package=0402, Max Operating Temperature=85°C, Min Operating Temperature=-55°C, Tolerance=20%, Voltage Rating=10V, Mounting Technology=SMT, Pins=2
Y1: library part CMP-27762-006353-1, "Crystal 25MHz ±10ppm 10pF SMD-4 3.2mm x 2.5mm"

## Free pads (board coordinates)
  rect 11.81x44.88 smd far side mask+1.97: 2(590,1391) 2(611,1391) 2(647.35,1391.72) 2(667.44,1391.72) 2(688.44,1391.72) 2(708.44,1391.72)

## Via types
v1: diameter 10, hole 5, Top Layer to Bottom Layer, 144 vias
v2: diameter 50, hole 28, Top Layer to Bottom Layer, 9 vias
v3: diameter 50, hole 30, Top Layer to Bottom Layer, 2 vias
v4: diameter 20, hole 10, Top Layer to Bottom Layer, 2 vias
v5: diameter 8, hole 5, Top Layer to Bottom Layer, 1 vias

## Nets (pads, with @x,y where several pads share a name; then routed paths per layer and width w, separated by ;. In a path a pad name is that pad's centre, name@x,y a point inside that pad or via, vN(x,y) a via of type N, cw(c..) or ccw(c..) an arc to the next point about the centre after c; other vN are vias at no path point)
-VAL: -VA_L.2 DAC_L.E6 FILT-L.1 | length 100.7
  Bottom Layer w8: DAC_L.E6@1114.25,342.99 1114.44,343.18 1114.44,396.73 -VA_L.2@1117.72,400 FILT-L.1@1160,400
-VAR: -VA_R.2 DAC_R.E6 FILT-R.1 | length 129.9
  Bottom Layer w3: -VA_R.2@447.72,410 447.72,382.28 455.43,374.57 455.43,361.54 468.5,348.47 DAC_R.E6@468.5,347.24 468.5,368.5 482.3,382.3 482.3,399.86 FILT-R.1@482.44,400
BOTTOM: BOTTOM.1 STM32H7.56 | length 1277.7
  Top Layer w8: STM32H7.56@1088.65,1645.2 1088.75,1645.1 1254.9,1645.1 v1(1255,1645)
  Bottom Layer w8: BOTTOM.1@1046.69,620 1046.69,628.86 1086.44,668.61 1086.44,803.39 1255,971.95 v1(1255,1645)
CBUS_V: C_bus.1 NPM1300.22 | length 53.9
  Top Layer w8: NPM1300.22@245.31,2945 245.31,2955 253,2962.69 253,2962.9 263.76,2973.66 263.76,2982.41 C_bus.1@270,2988.65
CC1: NPM1300.23 TYPE_C.A5 | length 427.3
  Top Layer w8: v2(210,2990) 218.04,2981.96 218.04,2962.59 224.63,2956 224.63,2946 NPM1300.23@225.63,2945 ; v2(290,3175) 289.47,3175.53 289.47,3232.46 288.94,3232.99 299.21,3243.27 TYPE_C.A5@299.21,3317.99
  Bottom Layer w8: v2(210,2990) 221.34,2990 241.83,3010.49 247.49,3010.49 290,3053 v2(290,3175)
CC2: NPM1300.24 TYPE_C.B5 | length 412.8
  Top Layer w8: v2(158.26,2984.83) 187.08,2956 204.94,2956 205.94,2955 NPM1300.24@205.94,2945 ; v2(170,3174) 171,3175 171,3190 170.83,3190.17 170.83,3285.83 179.2,3294.2 179.2,3316.09 TYPE_C.B5@181.1,3317.99
  Bottom Layer w8: v2(158.26,2984.83) 165,2991.57 165,3169 v2(170,3174)
CD: R6.1 SD.10 | length 73.8
  Top Layer w8: R6.1@1130,2340.43 1130,2410.97 SD.10@1132.34,2413.31
CENTER: CENTER.1 STM32H7.61 | length 1072
  Top Layer w8: STM32H7.61@1088.65,1743.63 1193.09,1743.63 1194.46,1745 v1(1195,1745)
  Bottom Layer w8: CENTER.1@965,891.69 979.7,906.39 1007.83,906.39 1101.42,999.98 1101.42,1021.42 1195,1115 v1(1195,1745)
ClkESR: C16.2 R8.1 Y1.3 | length 284.8
  Top Layer w8: Y1.3@257.55,1876.28 270,1888.72 270,1940 270,1938.03 272.1,1938.03 285,1925.13 285,1839 300,1824 R8.1@386.28,1824
DEBUG_DATA: STM32H7.72
DEBUGCLK: STM32H7.76
EINK_BUSY: pad.2@708.44,1391.72 STM32H7.34 | length 88.2
  Top Layer w8: v1(705,1435) 705.13,1435.13 705.13,1478.22 STM32H7.34@705.26,1478.35
  Bottom Layer w8: v1(705,1435) 705,1434.46 708.44,1431.02 pad.2@708.44,1391.72
EINK_CS: pad.2@590,1391 STM32H7.28 | length 88.5
  Top Layer w8: STM32H7.28@587.15,1478.35 587.15,1438.39 590,1435.54 v1(590,1435)
  Bottom Layer w8: pad.2@590,1391 v1(590,1435)
EINK_DC: pad.2@667.44,1391.72 STM32H7.32 | length 88
  Top Layer w8: v1(665,1435) 665,1435.54 665.89,1436.43 STM32H7.32@665.89,1478.35
  Bottom Layer w8: v1(665,1435) 665,1434.46 667.44,1432.02 pad.2@667.44,1391.72
EINK_RESET: pad.2@688.44,1391.72 STM32H7.33 | length 88.3
  Top Layer w8: v1(685,1435) 685.29,1435.29 685.29,1478.07 STM32H7.33@685.57,1478.35
  Bottom Layer w8: v1(685,1435) 685,1434.46 688.44,1431.02 pad.2@688.44,1391.72
EINK_SCK: pad.2@611,1391 STM32H7.29 | length 89.1
  Top Layer w8: STM32H7.29@606.83,1478.35 606.83,1438.71 610,1435.54 v1(610,1435)
  Bottom Layer w8: v1(610,1435) 610,1434.46 611,1433.46 pad.2@611,1391
eMMC_CLK: eMMC.M6 STM32H7.16 | length 1324.9
  Top Layer w8: STM32H7.16@479.35,1723.94 480.03,1724.62 529.62,1724.62 v1(530,1725) ; v1(631,1726) 655,1750 v1(807,1750) ; v1(1155,1769) 1156,1768 v1(1347,1768) ; v1(1701,1622) 1701.11,1621.89 eMMC.M6@1724.69,1621.89
  Bottom Layer w8: v1(530,1725) 531,1726 v1(631,1726) ; v1(807,1750) 826,1769 v1(1155,1769) ; v1(1347,1768) 1555,1768 v1(1701,1622)
eMMC_CMD: eMMC.M5 STM32H7.22 | length 1402.9
  Top Layer w8: STM32H7.22@479.35,1605.83 552.55,1605.83 563.39,1595 v1(614,1595) ; v1(582.59,1531.98) 1010.02,1531.98 1030,1512 v1(1271,1512) ; v1(1671.05,1581.34) 1703.82,1581.34 eMMC.M5@1724.69,1602.2
  Bottom Layer w8: v1(582.59,1531.98) 582.59,1563.59 v1(614,1595) ; v1(1271,1512) 1601.71,1512 v1(1671.05,1581.34)
eMMC_D0: eMMC.A3 STM32H7.53 | length 429.2
  Top Layer w8: STM32H7.53@1088.65,1586.15 1298.48,1586.15 1321.79,1562.83 eMMC.A3@1508.15,1562.83
eMMC_D1: eMMC.A4 STM32H7.54 | length 429.2
  Top Layer w8: STM32H7.54@1088.65,1605.83 1297.52,1605.83 1320.84,1582.52 eMMC.A4@1508.15,1582.52
eMMC_D2: eMMC.A5 STM32H7.89 | length 971.2
  Top Layer w5: v1@1478,1602 v1(1478.2,1602.2) eMMC.A5@1508.15,1602.2
  Top Layer w8: v1(764,2044) 764.16,2044.16 764.16,2087.49 STM32H7.89@764.31,2087.65
  Bottom Layer w5: v1(764,2044) 771,2044 845,1970 1110.41,1970 v1(1478.2,1602.2)
eMMC_D3: eMMC.B2 STM32H7.90 | length 1039.1
  Top Layer w2: v1@1518.35,1533.7 eMMC.B2@1527.83,1543.15
  Top Layer w5: STM32H7.90@742.72,2085.74 744.81,2083.65 744.81,2047.18 v1(745,2047)
  Bottom Layer w5: v1(745,2047) 834,1958 1094.02,1958 v1(1518.33,1533.7)
ENIK_MOSI: pad.2@647.35,1391.72 STM32H7.31 | length 88.1
  Top Layer w8: v1(645,1435) 645,1435.54 646.2,1436.75 STM32H7.31@646.2,1478.35
  Bottom Layer w8: v1(645,1435) 645,1434.46 647.35,1432.11 pad.2@647.35,1391.72
FILT+_L: DAC_L.D4 FILT+L.1 | length 129.8
  Bottom Layer w2: DAC_L.D4@1130,311.5 1137.08,311.5 1138.25,310.32 1138.25,308.39 1142.64,304 1148.11,304 1153.25,298.85 1153.25,277.64 1159.14,271.75 1213.13,271.75 FILT+L.1@1224.88,260
FILT+_R: DAC_R.D4 FILT+R.1 | length 122.3
  Bottom Layer w2: DAC_R.D4@484.25,315.75 492.5,307.5 503.11,307.5 508.25,302.36 508.25,281.15 513.39,276 534.6,276 539,271.61 539,271.17 540.17,270 FILT+R.1@574.88,270